# Altium PCB InterfaceBoard_MPCB.PcbDoc (part 3 of 3)
Units mil, origin at the board's own origin, x right, y up, seen from the top; angles counter-clockwise.
Board outline 1629.92 x 1653.54 mil, 4 copper layers (Top Layer, Power, Ground, Bottom Layer), stack 61.899 mil thick; 94 components, 58 nets, 296 pads, 186 vias.
Unrouted connection lines stored in the file: 1.
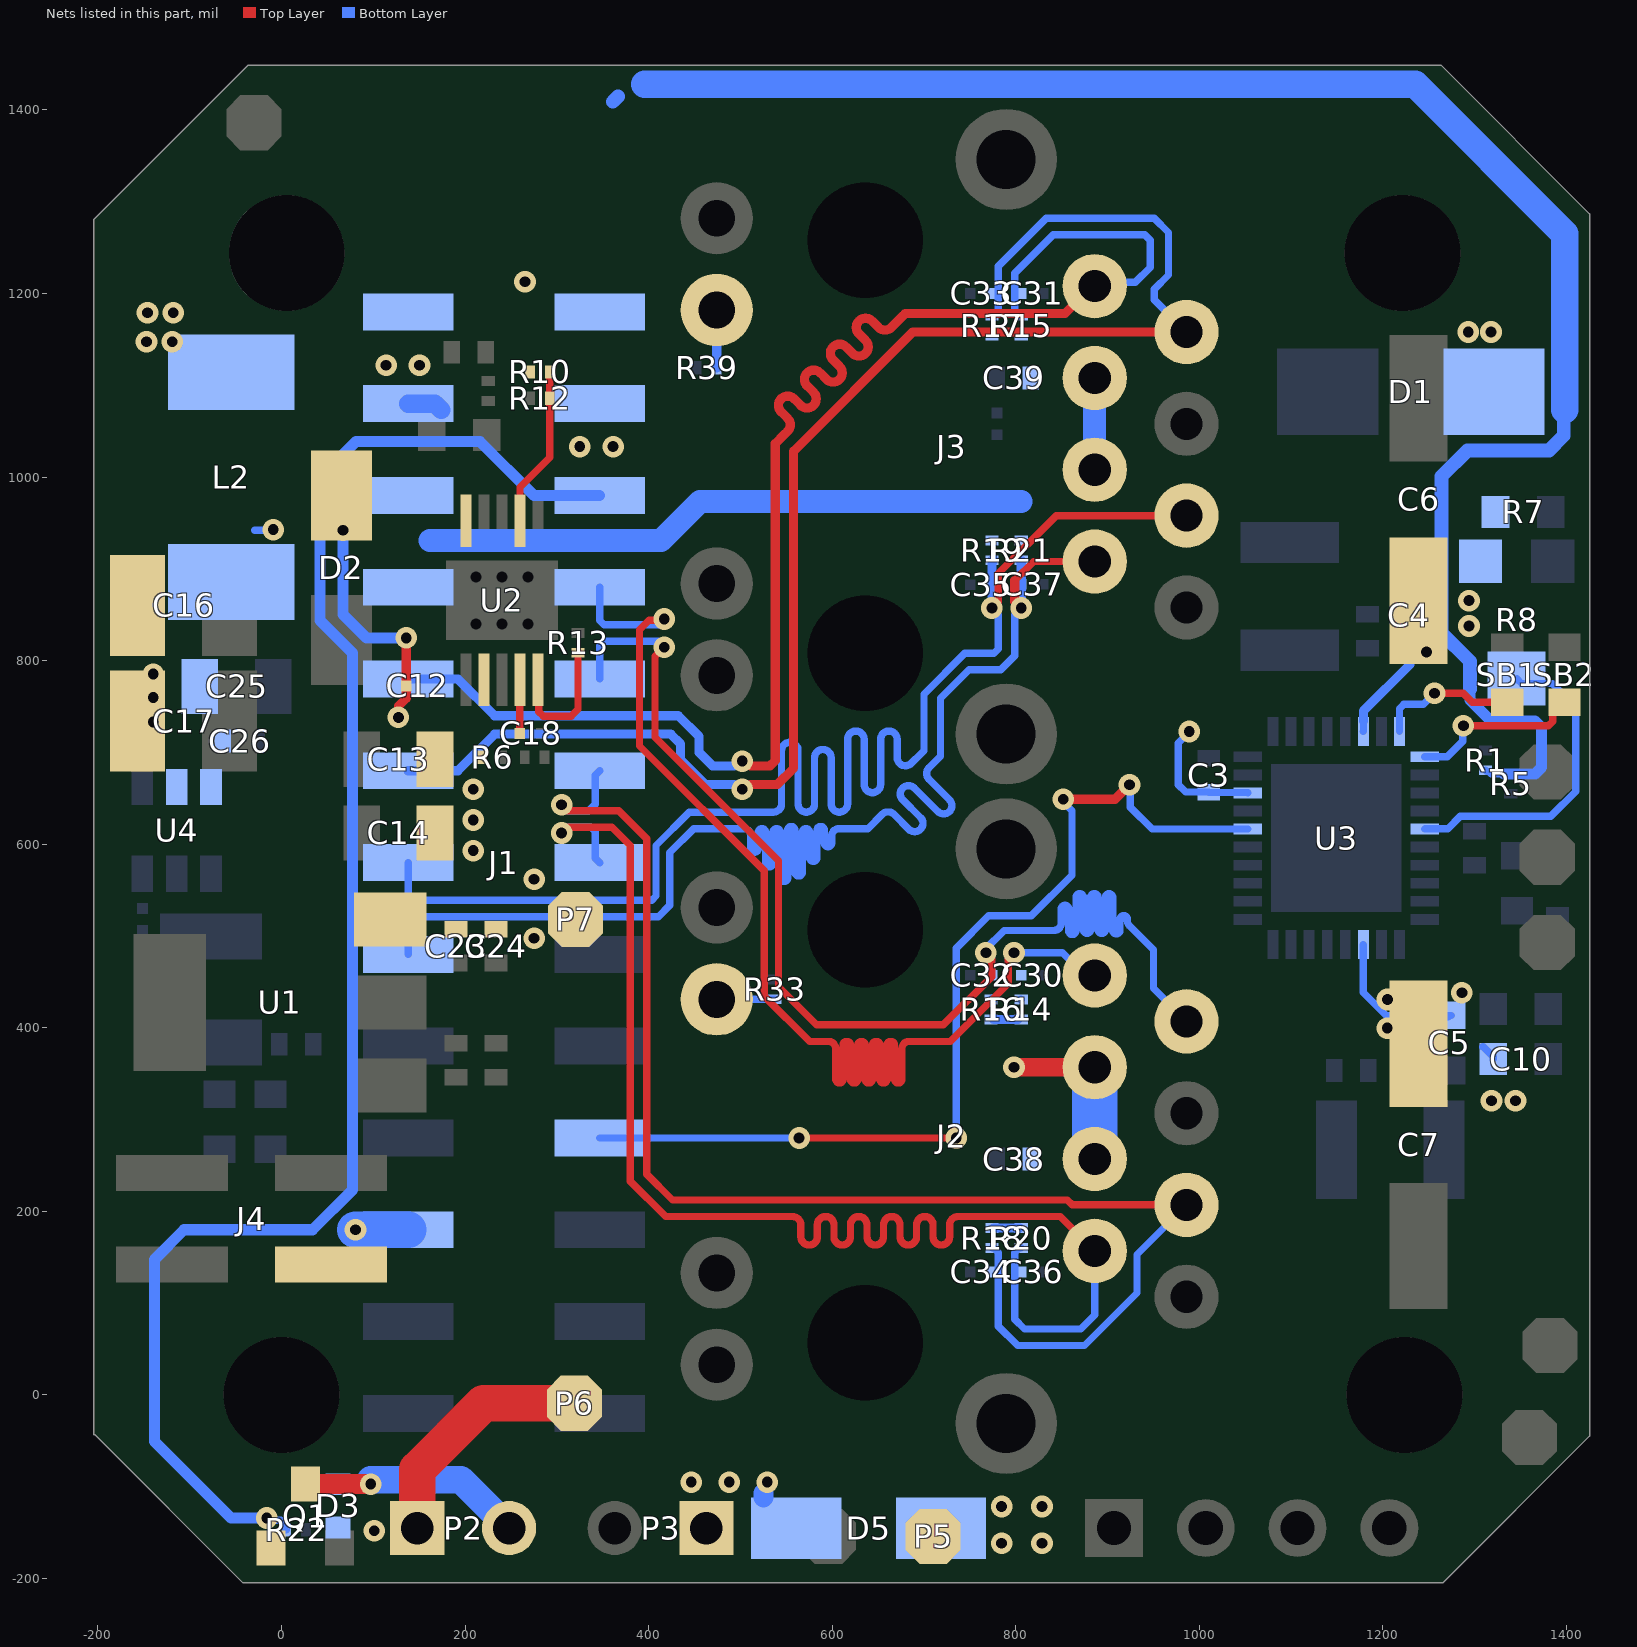
[diagram p4: the nets of this part, all layers, seen from the top]

## Via types
v1: diameter 23.62, hole 11.81, Top Layer to Bottom Layer, 186 vias

## Nets (pads, with @x,y where several pads share a name; then routed paths per layer and width w, separated by ;. In a path a pad name is that pad's centre, name@x,y a point inside that pad or via, vN(x,y) a via of type N, cw(c..) or ccw(c..) an arc to the next point about the centre after c; other vN are vias at no path point) (continued)
NetD5_2: D5.2 P3.1 | length 4.6
  Bottom Layer w22.01: 525,-107 525,-111.32 525.21,-111.54
  other v1: 446.34,-95 487.83,-95 529.31,-95
NetJ2_10: J2.10 R33.2 | length 63.2
  Bottom Layer w8: J2.10@474.18,431 R33.2@537.35,431
NetJ3_10: J3.10 R39.2 | length 63
  Bottom Layer w10: R39.2@474.18,1119 J3.10@474.18,1182.02
NetR7_1: R7.1 R8.1
NetR8_2: R8.2 U3.23 | length 350.6
  Bottom Layer w8: U3.23@1245.59,616.56 1246.08,617.04 1270.8,617.04 1284.1,630.34 1382.86,630.34 1410.01,657.49 1410.01,749.56 1384.45,775.12 1350.98,775.12 R8.2@1345.64,780.46
NetSB1_1: SB1.1 U3.18 | length 153.2
  Top Layer w8: v1(1256.25,764.49) 1287.51,764.49 1297.47,754.53 SB1.1@1335.39,754.53
  Bottom Layer w8: U3.18@1218.03,722.86 1218.03,747.64 1222.72,752.33 1243.76,752.33 1255.92,764.49 v1(1256.25,764.49)
NetSB2_1: SB2.1 U3.19 | length 191.8
  Top Layer w8: v1(1287.65,729.06) 1380.26,729.06 1384.95,733.75 1384.95,743.53 1395.95,754.53 SB2.1@1397.64,754.53
  Bottom Layer w8: U3.19@1245.59,695.3 1270,695.3 1286.87,712.16 1286.87,728.28 v1(1287.65,729.06)
OPTO_IN: J1.5 Q1.1 R22.1 | length 1767.6
  Bottom Layer w8: v1(-16,-134) -13.5,-136.5 -0.83,-136.5 3.86,-141.19 3.86,-145.68 R22.1@5.17,-147
  Bottom Layer w12: v1(-16,-134) -55,-134 -138.19,-50.81 -138.19,147.81 -106,180 33.89,180 77.19,223.31 77.19,808.35 42,843.54 42,1000 81,1039 216,1039 275,980 J1.5@346.65,980
PH: C12.2 D2.1 L2.1 U2.10 | length 282.1
  Top Layer w10: v1(127.36,738.21) 127.36,750.47 135.93,759.04 C12.2@135.93,772.49 v1(135.93,824.83)
  Bottom Layer w8: -29,942 -9,942 v1(-9,942.75)
  Bottom Layer w12: v1(67,942) 67,850.22 92.4,824.83 v1(135.93,824.83)
RCS: D3.1 P2.2 Q1.3 | length 279.6
  Top Layer w22: Q1.3@26,-97.16 v1(97.31,-97.16)
  Bottom Layer w20: D3.1@61.66,-97.16 v1(97.31,-97.16)
  Bottom Layer w22: v1(97.31,-97.16) v1(97.31,-97.16)
  Bottom Layer w30: v1@97.31,-92.16 195.15,-92.16 P2.2@247.99,-145
RT/CLK: R13.2 U2.5 | length 135.1
  Top Layer w8: U2.5@279.61,773.01 280.33,772.29 280.33,744.31 285.02,739.62 315.52,739.62 323.01,747.11 R13.2@323.01,805.49
RXA_N: C36.1 J1.13 J2.7 R20.2 | length 1546.5
  Top Layer w8: v1(305.2,612.31) 311.51,618.62 360,618.62 380,598.62 380,233 418.63,194.37 534.88,194.37 556.88,194.37 cw(c556.88,185.37) 565.88,185.37 565.88,172.29 ccw(c574.88,172.29) 583.88,172.29 583.88,185.37 cw(c592.88,185.37) 601.88,185.37 601.88,172.29 ccw(c610.88,172.29) 619.88,172.29 619.88,185.37 cw(c628.88,185.37) 637.88,185.37 637.88,172.29 ccw(c646.88,172.29) 655.88,172.29 655.88,185.37 cw(c664.88,185.37) 673.88,185.37 673.88,172.29 ccw(c682.88,172.29) 691.88,172.29 691.88,185.37 cw(c700.88,185.37) 709.88,185.37 709.88,172.29 ccw(c718.88,172.29) 727.88,172.29 727.88,185.37 cw(c736.88,185.37) 736.88,194.37 771.89,194.37 848.6,194.37 J2.7@885.99,156.98
  Bottom Layer w8: v1(305.2,612.31) 311.51,618.62 334.9,618.62 ; 337.28,618.62 341.97,613.94 341.97,584.69 J1.13@346.65,580 ; R20.2@806,160.17 804.03,160.17 799.01,155.15 799.01,82.4 809.46,71.94 870.81,71.94 885.99,87.13 J2.7@885.99,156.98
RXA_P: C34.1 J1.11 J2.6 R18.2 | length 1547
  Top Layer w8: v1(305.2,642.93) 308.36,639.78 311.51,636.62 367.46,636.62 398,606.08 398,240.46 426.08,212.37 550.36,212.37 605.27,212.37 856.06,212.37 861.33,207.1 985.88,207.1 J2.6@985.99,206.98
  Bottom Layer w8: v1(305.2,642.93) 311.51,636.62 334.9,636.62 341.97,643.69 341.97,675.31 J1.11@346.65,680 ; R18.2@774.02,160.18 775.98,160.18 781.01,155.15 781.01,74.95 802.01,53.94 874.94,53.94 932,111.01 932,152.99 J2.6@985.99,206.98
RXB_N: C37.1 J1.16 J3.7 R21.2 | length 1710.4
  Top Layer w8: v1@798.93,864.33 v1(805.92,857.34) ; 798.93,887.47 819.47,908.01 J3.7@885.99,908.01
  Top Layer w10: v1@798.93,864.33 798.93,887.47
  Bottom Layer w8: J1.16@137.99,480 137.99,516.31 142.68,521 410.77,521 423.18,533.41 423.18,590.98 449.21,617 459.43,617 503.43,617 cw(c503.43,609) 511.43,609 511.43,595.37 ccw(c515.43,595.37) 519.43,595.37 519.43,613 cw(c523.43,613) 527.43,613 527.43,579.37 ccw(c531.43,579.37) 535.43,579.37 535.43,613 cw(c539.43,613) 543.43,613 543.43,563.37 ccw(c547.43,563.37) 551.43,563.37 551.43,615.2 cw(c555.43,615.2) 559.43,615.2 559.43,569.41 ccw(c563.43,569.41) 567.43,569.41 567.43,613 cw(c571.43,613) 575.43,613 575.43,585.41 ccw(c579.43,585.41) 583.43,585.41 583.43,615.35 cw(c587.43,615.35) 591.43,615.35 591.43,601.41 ccw(c595.43,601.41) 599.43,601.41 599.43,609 cw(c607.43,609) 607.43,617 639,617 654.56,632.56 cw(c660.92,626.19) 667.28,632.56 683.5,616.34 ccw(c689.87,622.7) 696.23,616.34 ccw(c689.87,622.7) 696.23,629.07 676.76,648.54 cw(c683.12,654.9) 676.76,661.27 cw(c683.12,654.9) 689.48,661.27 715.12,635.64 ccw(c721.48,642) 727.84,635.64 ccw(c721.48,642) 727.84,648.37 705.47,670.74 cw(c711.83,677.1) 705.47,683.47 718,696 718,713.6 718,758.99 749.02,790.01 783.7,790.01 798.93,805.24 798.93,850.34 v1(805.92,857.34)
  Bottom Layer w10: R21.2@803.94,909.29 R21.2@804,909.35 ; v1@805.94,857.35 805.94,883.29 R21.2@805.94,909.29
RXB_P: C35.1 J1.14 J3.6 R19.2 | length 1699.9
  Top Layer w8: v1(773.93,857.34) 780.93,864.34 780.93,894.92 844.01,958.01 J3.6@985.99,958.01
  Bottom Layer w8: J1.14@137.99,580 137.99,543.69 142.68,539 403.31,539 408,543.69 408,598.69 444.31,635 494.17,635 535.79,635 ccw(c535.79,644) 544.79,644 544.79,702.04 cw(c553.79,702.04) 562.79,702.04 562.79,644 ccw(c571.79,644) 580.79,644 580.79,694.23 cw(c589.79,694.23) 598.79,694.23 598.79,644 ccw(c607.79,644) 616.79,644 616.79,714.25 cw(c625.79,714.25) 634.79,714.25 634.79,665.24 ccw(c643.79,665.24) 652.79,665.24 652.79,714.25 cw(c661.79,714.25) 670.79,714.25 670.79,694.51 ccw(c679.79,694.51) 686.15,688.15 697.29,699.29 700,702 700,763.47 744.54,808.01 776.24,808.01 780.93,812.69 780.93,850.35 v1(773.93,857.34)
  Bottom Layer w10: v1@773.95,857.36 C35.1@773.95,883.3 ; C35.1@774.02,882.78 R19.2@774.02,909.35
SS/TR: C18.2 U2.4 | length 57.4
  Top Layer w8: C18.2@259.5,720.76 259.72,720.98 259.72,777.8 U2.4@259.93,778.01
STEP: J1.19 U3.6 | length 1083
  Top Layer w8: v1(564,280) v1(735.12,280)
  Top Layer w10: v1(851.65,649) 908.03,649 v1(923.89,664.86)
  Bottom Layer w8: J1.19@346.65,280 v1(564,280) ; v1(735.12,280) 735.09,486.85 770.24,522 816.95,522 861.22,566.26 861.22,636.5 851.65,646.06 v1(851.65,649) ; v1@924.89,665.86 924.89,640.28 948.61,616.56 U3.6@1052.68,616.56
TXA_N: C32.1 J1.9 J2.2 R16.2 | length 1478.7
  Top Layer w8: v1(417,814.69) 407,804.69 407,716.41 541.43,581.98 541.43,444.57 582.84,403.16 721.05,403.16 773.7,455.81 773.7,475.45 v1(767.39,481.76)
  Bottom Layer w8: J1.9@346.65,780 346.65,816.31 351.34,821 410.69,821 v1(417,814.69) ; 773.7,463.19 773.7,471.22 767.39,477.53 v1(767.39,481.76) 767.39,485.99 787.49,506.09 805.6,506.09 841.6,506.09 ccw(c841.6,514.09) 849.6,514.09 849.6,529.44 cw(c853.6,529.44) 857.6,529.44 857.6,505.7 ccw(c861.6,505.7) 865.6,505.7 865.6,542.05 cw(c869.6,542.05) 873.6,542.05 873.6,507.02 ccw(c877.6,507.02) 881.6,507.02 881.6,542.05 cw(c885.6,542.05) 889.6,542.05 889.6,507.02 ccw(c893.6,507.02) 897.6,507.02 897.6,542.05 cw(c901.6,542.05) 905.6,542.05 905.6,506.48 ccw(c909.6,506.48) 913.6,506.48 913.6,518.19 cw(c917.6,518.19) 921.6,518.19 921.6,516.67 ccw(c929.6,516.67) 923.95,511.01 948.61,486.35 949.99,484.97 949.99,442.99 J2.2@985.99,406.98 ; R16.2@774.02,430.83 R16.2@775.33,430.83 ; R16.2@774.02,432.14 R16.2@775.33,430.83 ; R16.2@775.98,430.83 R16.2@775.33,430.83
TXA_P: C30.1 J1.7 J2.1 R14.2 | length 1483.9
  Top Layer w8: v1(417,845.31) 415.89,844.2 400.43,844.2 390,833.77 390,707 526,571 526,434.54 575.38,385.16 595.88,385.16 cw(c595.88,377.16) 603.88,377.16 603.88,343.9 ccw(c607.88,343.9) 611.88,343.9 611.88,381.16 cw(c615.88,381.16) 619.88,381.16 619.88,343.9 ccw(c623.88,343.9) 627.88,343.9 627.88,381.16 cw(c631.88,381.16) 635.88,381.16 635.88,343.9 ccw(c639.88,343.9) 643.88,343.9 643.88,381.16 cw(c647.88,381.16) 651.88,381.16 651.88,343.9 ccw(c655.88,343.9) 659.88,343.9 659.88,381.16 cw(c663.88,381.16) 667.88,381.16 667.88,343.9 ccw(c671.88,343.9) 675.88,343.9 675.88,377.16 cw(c683.88,377.16) 683.88,385.16 687.88,385.16 728.5,385.16 791.7,448.36 791.7,475.45 v1(798.01,481.76)
  Bottom Layer w8: J1.7@346.65,880 346.65,843.69 351.34,839 410.69,839 v1(417,845.31) ; 791.7,463.19 791.7,471.22 798.01,477.53 v1(798.01,481.76) 850.87,481.76 875.65,456.98 J2.1@885.99,456.98 ; R14.2@804.03,430.83 R14.2@806,430.83 R14.2@805.46,431.37
TXB_N: C33.1 J1.12 J3.2 R17.2 | length 1709.2
  Top Layer w10: v1(502.02,659.92) 505.71,659.92 511.02,665.23 540.43,665.23 558,682.81 558,1028.22 687.82,1158.05 J3.2@985.99,1158.01 J3.2@985.99,1158.01
  Bottom Layer w8: R17.2@774.02,1175.83 775.98,1175.83 781.01,1180.85 781.01,1229.7 833.31,1282 899,1282 950.83,1282 966.41,1266.43 966.41,1220.12 950.88,1204.6 950.88,1193.12 J3.2@985.99,1158.01
  Bottom Layer w10: J1.12@137.99,680 192.21,680 232.21,720 424,720 434.81,709.19 434.81,691.79 461.37,665.23 493.02,665.23 498.33,659.92 v1(502.02,659.92)
TXB_P: C31.1 J1.10 J3.1 R15.2 | length 1708.2
  Top Layer w10: v1(502.02,690.54) 505.71,690.54 511.02,685.23 532.14,685.23 538,691.09 538,1036.51 547.88,1046.39 551.42,1049.93 ccw(c544.35,1057) 551.42,1064.07 544.35,1071.14 cw(c551.42,1078.21) 544.35,1085.28 cw(c551.42,1078.21) 558.49,1085.28 565.56,1078.21 ccw(c572.63,1085.28) 579.7,1078.21 ccw(c572.63,1085.28) 579.7,1092.35 572.63,1099.42 cw(c579.7,1106.49) 572.63,1113.57 cw(c579.7,1106.49) 586.77,1113.57 593.85,1106.49 ccw(c600.92,1113.57) 607.99,1106.49 ccw(c600.92,1113.57) 607.99,1120.64 600.92,1127.71 cw(c607.99,1134.78) 600.92,1141.85 cw(c607.99,1134.78) 615.06,1141.85 622.13,1134.78 ccw(c629.2,1141.85) 636.27,1134.78 ccw(c629.2,1141.85) 636.27,1148.92 629.2,1155.99 cw(c636.27,1163.06) 629.2,1170.13 cw(c636.27,1163.06) 643.34,1170.13 650.41,1163.06 ccw(c657.48,1170.13) 664.56,1163.06 677.08,1175.59 679.54,1178.05 853.47,1178.05 883.43,1208.01 J3.1@885.99,1208.01
  Bottom Layer w8: R15.2@806,1175.83 804.03,1175.83 799.01,1180.85 799.01,1222.25 840.76,1264 899,1264 940.55,1264 946.41,1258.14 946.41,1228.41 930.17,1212.17 J3.1@890.16,1212.17
  Bottom Layer w10: J1.10@137.99,780 192.21,780 232.21,740 432.28,740 454.81,717.47 454.81,700.08 469.66,685.23 493.02,685.23 498.33,690.54 v1(502.02,690.54) ; J3.1@885.99,1208.01 J3.1@890.16,1212.17
VCC_3V3: C3.2 C23.2 C24.2 J1.1 J1.3 P7.1 R1.1 R5.1 U1.3 U3.8 | length 2049.1
  Top Layer w8: v1@269,496 269.94,496 v1@270.32,495.63
  Bottom Layer w8: v1(988.96,722.86) 988.96,722.32 977,710.36 977,664.92 985.06,656.86 C3.2@1010.24,656.86 ; C3.2@1009.77,656.86 1010.24,656.39 1052.21,656.39 U3.8@1052.68,655.93 ; R1.1@1311.75,680.58 1313.06,679.27 1315.03,679.27 1317.72,676.58 1331.86,676.58
  Bottom Layer w12: 1294.75,768.94 1294.75,757.06 1317.72,734.09 1365.72,734.09 1372.75,727.06 1372.75,683.61 1365.72,676.58 1331.86,676.58
  Bottom Layer w15: 361,1409 366.5,1414.5 ; 1294.75,768.94 1294.75,799.34 1263.88,830.2 1263.88,1000.88 1292,1029 1380.88,1029 1397,1045.12 1397,1073.54
  Bottom Layer w30: 395.87,1428 1201.95,1428 1235,1428 1398.12,1264.88 1398.12,1073.54
  other v1: 275.22,497.63 275.22,561.84 325,1033.2 361.34,1033.2
VDD_5V: J1.22 J4.1 | length 57.6
  Bottom Layer w40: v1(80.55,180) J1.22@137.99,180 J1.22@137.91,180.08
VDDTXRX1: C38.1 J1.2 J1.4 J2.3 J2.5 R14.1 R16.1 R18.1 R20.1 | length 336.8
  Top Layer w20: v1(798.01,356.98) J2.3@885.99,356.98
  Bottom Layer w10: R18.1@776.02,181.83 R20.1@804,181.83 ; R16.1@776.02,409.18 788.74,409.18 R14.1@802.47,409.18
  Bottom Layer w20: J1.4@137.99,1080 167.13,1080 J1.4@174.07,1073.06
  Bottom Layer w25: J2.5@874.5,288.65 cw(c850.86,280.52) J2.5@874.99,274 ; J2.5@874.99,274 J2.5@885.99,256.98 J2.5@874.99,274
  Bottom Layer w50: J2.5@885.99,256.98 J2.3@885.99,356.98
  other v1: 114,1121.77 150.34,1121.77
VDDTXRX2: C39.1 J1.6 J1.8 J3.3 J3.5 R15.1 R17.1 R19.1 R21.1 | length 761.5
  Bottom Layer w25: 162,931 413.58,931 456.08,973.51 805.94,973.51 ; J3.5@885.99,1008.01 J3.3@885.99,1108.01
VIN: C4.1 C5.1 C6.1 C7.1 C10.2 C13.2 C14.2 D1.2 D5.1 P5.1 R6.2 U2.2 U3.16 U3.31 | length 293.9
  Bottom Layer w8: U3.31@1178.66,490.58 1178.66,452.07 1178.66,438.4 1203.58,413.48 1269.75,413.48 C5.1@1271,412.23 ; U3.16@1178.66,722.86 1178.89,723.09 U3.16@1178.89,734.17 ; C5.1@1272.25,413.48 C5.1@1274.75,413.48 ; C10.2@1308.75,379.48 1309.24,379.48 1320.24,368.48 C10.2@1320.24,365.98
  Bottom Layer w10: U3.16@1178.89,734.17 1178.89,745.26 1229.34,795.71 C4.1@1229.34,819.36
  other v1: 784.54,-161.5 828.51,-161.5 784.54,-121.51 828.51,-121.51 1318.24,320.54 1344.32,320.54 1204.76,399.69 1205.03,430.77 1286.02,438.24 209,593 209,626.46 209,659.92 1247.34,809.36 1293.84,837.85 1293.84,865.36 1293,1158 1317.82,1158
VOUT_12V: C16.2 C17.2 C25.2 C26.2 D3.2 L2.2 P2.1 P6.1 R10.2 U4.2 U4.3 | length 264.8
  Top Layer w40: P2.1@147.99,-145 147.99,-80.99 219.99,-9 P6.1@319,-9
  other v1: 100.99,-148 -139.78,733.1 -139.78,759.72 -139.78,785.34 -147,1147.44 -119,1147.44 -146,1179 -118,1179 265.37,1212.86
VSENSE: R10.1 R12.2 U2.7 | length 176.7
  Top Layer w8: U2.7@259.93,951.24 259.93,988.89 292.34,1021.31 R12.2@292.34,1085.72 R10.1@292.35,1114.49
pads on no net: J2.11 J2.12 J2.MH1 J2.MH2 J3.11 J3.12 J3.MH1 J3.MH2 U2.6 U3.9 U3.11 U3.17

## Polygon pours and split planes (outlines as drawn)
GND on Ground (split plane): 1405.09,1278.41 1405.09,-36.48 1256.94,-184.63 -33.49,-184.63 -184.63,-33.48 -184.63,1271.95 -27.86,1428.72 704.93,1428.72 704.93,1268 705.22,1265.06 706.07,1262.23 707.47,1259.63 709.34,1257.34 711.63,1255.47 714.23,1254.07 717.06,1253.22 720,1252.93 905.96,1252.93 905.96,815.07 716,815.07 713.06,814.78 710.23,813.93 707.63,812.53 705.34,810.66 703.47,808.37 702.07,805.77 701.22,802.94 700.93,800 700.93,515 701.22,512.06 702.07,509.23 703.47,506.63 705.34,504.34 707.63,502.47 710.23,501.07 713.06,500.22 716,499.93 905.96,499.93 905.96,55.07 711,55.07 708.06,54.78 705.23,53.93 702.63,52.53 700.34,50.66 698.47,48.37 697.07,45.77 696.22,42.94 695.93,40 695.93,-80 696.22,-82.94 697.07,-85.77 698.47,-88.37 700.34,-90.66 702.63,-92.53 705.23,-93.93 708.06,-94.78 711,-95.07 1039,-95.07 1041.94,-94.78 1044.77,-93.93 1047.37,-92.53 1049.66,-90.66 1051.53,-88.37 1052.93,-85.77 1053.78,-82.94 1054.07,-80 1054.07,1428.72 1254.78,1428.72
GND_ETH on Ground (split plane): 1023.93,-64.93 726.07,-64.93 726.07,24.93 921.03,24.93 923.97,25.22 926.8,26.07 929.41,27.47 931.69,29.34 933.56,31.63 934.96,34.23 935.82,37.06 936.11,40 936.11,515 935.82,517.94 934.96,520.77 933.56,523.37 931.69,525.66 929.41,527.53 926.8,528.93 923.97,529.78 921.03,530.07 731.07,530.07 731.07,784.93 921.03,784.93 923.97,785.22 926.8,786.07 929.41,787.47 931.69,789.34 933.56,791.63 934.96,794.23 935.82,797.06 936.11,800 936.11,1268 935.82,1270.94 934.96,1273.77 933.56,1276.37 931.69,1278.66 929.41,1280.53 926.8,1281.93 923.97,1282.78 921.03,1283.07 735.07,1283.07 735.07,1428.72 1023.93,1428.72
VCC_3V3 on Power (split plane): 379.93,199.93 380.22,196.99 381.07,194.16 382.47,191.56 384.34,189.27 386.63,187.4 389.23,186 390.6,185.59 391.05,185.29 393,184.9 393.51,185 395,184.86 397.94,185.15 398.97,185.46 399.99,185.15 402.93,184.86 921.03,184.86 923.97,185.15 926.8,186 929.41,187.4 931.69,189.27 933.56,191.56 934.96,194.16 935.82,196.99 936.11,199.93 936.11,421.94 935.82,424.88 935.77,425.03 935.82,425.17 936.11,428.12 936.11,805.93 1020.93,805.93 1020.93,523 1020.93,114.81 258.07,114.81 258.07,1048.24 379.93,1048.24
VDDTXRX1 on Power (split plane): 473.93,883.99 473.93,783.99 473.93,421.94 474.22,419 475.07,416.18 476.47,413.57 478.34,411.29 480.63,409.41 483.23,408.02 486.06,407.16 489,406.87 905.96,406.87 905.96,215 410.07,215 410.07,1063.31 409.78,1066.25 408.93,1069.08 407.53,1071.68 405.66,1073.97 403.37,1075.84 400.77,1077.24 397.94,1078.09 395,1078.38 88.07,1078.38 88.07,1147.93 473.93,1147.93
MOTOR_B2 on Power (split plane): 1185.27,744.13 1098,744.13 1095.06,743.84 1092.23,742.99 1089.63,741.59 1087.34,739.72 1085.47,737.44 1084.07,734.83 1083.22,732 1082.93,729.06 1082.93,81.23 1067.34,65.65 1065.47,63.36 1064.07,60.76 1063.22,57.93 1062.93,54.99 1063.22,52.05 1064.07,49.22 1065.47,46.62 1067.34,44.33 1069.63,42.46 1072.23,41.06 1075.06,40.21 1078,39.92 1080.94,40.21 1082.93,40.81 1082.93,-47.92 735.16,-47.92 735.16,84.67 1036,84.67 1038.94,84.96 1041.77,85.82 1044.37,87.21 1046.66,89.08 1048.53,91.37 1049.93,93.97 1050.78,96.8 1051.07,99.74 1051.07,523 1051.07,805.93 1185.27,805.93
VIN on Power (split plane): 1327.93,1231.76 1327.93,829 1327.93,776.33 1327.93,664.9 1327.93,610.07 1251.84,610.07 1248.9,609.78 1246.07,608.93 1243.47,607.53 1241.18,605.66 1239.31,603.37 1237.92,600.77 1237.06,597.94 1236.77,595 1236.77,459 1237.06,456.06 1237.92,453.23 1239.31,450.63 1241.18,448.34 1243.47,446.47 1246.07,445.07 1248.9,444.22 1251.84,443.93 1405.09,443.93 1405.09,31.08 1405,31.09 1403.05,30.71 1401.4,29.6 1400.29,27.95 1399.91,26 1400.29,24.05 1401.4,22.39 1405.09,18.7 1405.09,-36.48 1256.94,-184.63 1149.32,-184.63 1148.95,-184.38 1147,-183.99 1145.05,-184.38 1144.68,-184.63 425.11,-184.63 425.11,40 424.82,42.94 423.96,45.77 422.57,48.37 420.7,50.66 418.41,52.53 415.81,53.93 412.98,54.78 410.04,55.07 -52.93,55.07 -52.93,1048.24 227.93,1048.24 227.93,99.74 228.22,96.8 229.07,93.97 230.47,91.37 232.34,89.08 234.63,87.21 237.23,85.82 240.06,84.96 243,84.67 705.01,84.67 705.01,-62.99 705.3,-65.93 706.16,-68.76 707.56,-71.37 709.43,-73.65 711.71,-75.52 714.32,-76.92 717.15,-77.78 720.09,-78.06 1098,-78.06 1100.94,-77.78 1103.77,-76.92 1106.37,-75.52 1108.66,-73.65 1110.53,-71.37 1111.93,-68.76 1112.78,-65.93 1113.07,-62.99 1113.07,79.74 1113.07,713.99 1200.35,713.99 1203.29,714.28 1206.11,715.14 1208.72,716.53 1211,718.4 1212.88,720.69 1214.27,723.29 1215.13,726.12 1215.42,729.06 1215.42,821 1215.13,823.94 1214.27,826.77 1212.88,829.37 1211,831.66 1208.72,833.53 1206.11,834.93 1203.29,835.78 1200.35,836.07 921.03,836.07 918.09,835.78 915.26,834.93 912.66,833.53 910.37,831.66 908.5,829.37 907.11,826.77 906.25,823.94 905.96,821 905.96,437.02 504.07,437.02 504.07,783.99 504.07,883.99 504.07,1163 503.78,1165.94 502.93,1168.77 501.53,1171.37 499.66,1173.66 497.37,1175.53 494.77,1176.93 491.94,1177.78 489,1178.07 340.07,1178.07 340.07,1268 340.07,1350.93 1208.76,1350.93
5V_EXT on Power (split plane): 1405.09,1278.41 1405.09,474.07 1266.91,474.07 1266.91,579.93 1343,579.93 1345.94,580.22 1348.77,581.07 1351.37,582.47 1353.66,584.34 1355.53,586.63 1356.93,589.23 1357.78,592.06 1358.07,595 1358.07,664.9 1358.07,776.33 1358.07,829 1358.07,1238 1357.78,1240.94 1356.93,1243.77 1355.53,1246.37 1353.66,1248.66 1225.66,1376.66 1223.37,1378.53 1220.77,1379.93 1217.94,1380.78 1215,1381.07 325,1381.07 322.06,1380.78 319.23,1379.93 316.63,1378.53 314.34,1376.66 312.47,1374.37 311.07,1371.77 310.22,1368.94 309.93,1366 309.93,1283.07 -173.51,1283.07 -27.86,1428.72 1254.78,1428.72
VOUT_12V on Power (split plane): 309.93,1178.07 73,1178.07 70.06,1177.78 67.23,1176.93 64.63,1175.53 62.34,1173.66 60.47,1171.37 59.07,1168.77 58.22,1165.94 57.93,1163 58.22,1160.06 58.24,1160 58.22,1159.94 57.93,1157 57.93,1078.38 -68,1078.38 -70.94,1078.09 -73.77,1077.24 -76.37,1075.84 -78.66,1073.97 -80.53,1071.68 -81.93,1069.08 -82.78,1066.25 -83.07,1063.31 -83.07,40 -82.78,37.06 -81.93,34.23 -80.53,31.63 -78.66,29.34 -76.37,27.47 -73.77,26.07 -70.94,25.22 -68,24.93 394.96,24.93 394.96,-184.63 -33.49,-184.63 -184.63,-33.48 -184.63,1252.93 309.93,1252.93

## Other copper
Top Layer:
  rectangle net PH: -93,922.69 114,1039
  rectangle net GND: 1040,1142.48 1155.81,1182.14
  rectangle net VIN: 1222.74,796.46 1307.47,858.01
  rectangle net VIN: 1195.02,807.22 1307.64,934.26
  rectangle net #UART_RX: -185.26,110.5 -32.62,172
  rectangle net VIN: 675.92,-191 843,-95
  rectangle net VIN: 1280.2,1129 1362,1168.66
  rectangle net NetSB2_1: 1364,739.53 1415.14,769.53
  rectangle net MOTOR_A1: 875.5,-176.5 938.49,-88.01
  rectangle net NetD5_2: 424,-193 548,-79
  rectangle net GND: 1040,1014 1271,1159.73
  region net VOUT_12V: 280.02,1227 250.02,1227 250.02,1103.22 280.02,1103.22
  rectangle net VCC_3V3: 265,479.6 360,576.9
  region net GND: 197.63,1152 171.63,1152 171.63,1045.71 197.63,1045.71
  rectangle net GND: -161.07,374.08 253,479.61
  rectangle net VOUT_12V: -195.75,582.31 -107.75,1199.55
  rectangle net GND: 1174.88,91 1305.24,245
  rectangle net VIN: 1193.34,303 1356.5,451.67
  rectangle net GND: 1317.89,799.53 1417,895
  rectangle net GND: 94.82,846.3 193.61,915.1
  rectangle net VCC_3V3: 79.08,488.13 360,548.13
  rectangle net 5V_EXT: -25,306.6 253,366.6
  rectangle net GND: -185.26,192 -44.54,504.7
  rectangle net GND: 14,-185.98 79.19,-137
  rectangle net OPTO_IN: -33,-185.98 4.39,-122.75
  rectangle net VDD_5V: -12.03,110.5 115.02,201.65
  rectangle net GND: -93,582.31 107.36,915.1
  region net NetC19_2: 239.88,1152 207.97,1152 207.97,1098.72 239.88,1098.72
  rectangle net GND: 254.02,1045.71 279.52,1095.72
  rectangle net GND: 162.34,994.32 226.69,1016
  region net GND: 226.69,1016 214.65,1016 214.65,903.99 226.69,903.99
  region net GND: 197.63,1063.21 148.61,1063.21 148.61,994.32 197.63,994.32
  rectangle net COMP: 207.97,1028.21 239.88,1091.72
  region net COMP: 246.38,1091.72 234.34,1091.72 234.34,922.69 246.38,922.69
  rectangle net PH: 15,922.69 206.78,980.78
  rectangle net EN/TPS: 235.08,687.29 270.32,701.86
  region net GND: 277.46,726.67 277.46,687.29 292.03,687.29 292.03,726.67
  rectangle net VIN: 214.43,691.29 226.46,806.55
  rectangle net VIN: 146.36,576.9 226.46,732.21
  rectangle net BOOT: 153.65,749.46 206.78,808.69
  rectangle net GND: 176.63,821.31 332.57,915.1
Bottom Layer:
  rectangle net PH: -123.77,844.57 14.02,958
  rectangle net VOUT_12V: -160,1138.37 -81,1194
  rectangle net VOUT_12V: -160,1072.91 14.02,1157
  rectangle net 5VOUT: 1295.25,563.82 1342,595
  rectangle net GND: 1039,1142.48 1155.81,1182.14
  rectangle net RCS: 41.79,-108.97 113,-75
  rectangle net VIN: 1210.84,786.92 1259.34,813.86
  rectangle net GND: 1346,834.53 1411.63,932.04
  rectangle net GND: -194.75,200.08 -25,297.08
  rectangle net NetC20_2: -132.1,500.08 14.71,526.07
  rectangle net VIN: 658,-194 843,-95
  rectangle net GND: 1249.22,91 1310.24,248.28
  rectangle net VIN: 1298.24,309 1356.38,394.48
  rectangle net VIN: 1174.66,375.48 1335.24,394.48
  rectangle net VIN: 1174.66,379.48 1293.21,442.4
  rectangle net NetC10_1: 1212.13,470.83 1253.38,502.32
  rectangle net 5V_EXT: 5.47,306.58 63.5,359.92
  rectangle net GND: 25.62,369.58 63.5,799
  rectangle net 5V_EXT: -194.75,306.58 15.12,444.49
  region net TXA_P: 813.28,463.44 787.7,463.44 787.7,425.51 813.28,425.51
  rectangle net GND: 1174.88,340.98 1289.75,368.48
  rectangle net GND: 1189.32,91 1289.75,368.48
  rectangle net 5V_EXT: 1328.38,506.32 1417.75,552.82
  region net 5V_EXT: -171.38,669.51 -194.75,669.51 -194.75,306.58 -171.38,306.58
  rectangle net GND: -194.75,225 58.97,297.08
  rectangle net 5VOUT: 1295.25,567.82 1372.75,586.19
  rectangle net 5VOUT: 1328.12,563.82 1394.04,608.82
  region net TXA_N: 780.3,463.19 765.73,463.19 765.73,425.51 780.3,425.51
  rectangle net TXB_N: 768.11,1170.51 781.3,1205.95
  rectangle net TXB_P: 800.1,1170.51 813.28,1205.95
  rectangle net RXA_P: 767.72,128.1 780.91,165.49
  rectangle net RXA_N: 798.72,128.1 811.91,165.49
  rectangle net VIN: 1265.88,1045.76 1376.12,1171
  rectangle net VDDTXRX1: 764.2,344.02 813.28,416.49
  rectangle net GND: -46.87,785.1 13.38,835
  rectangle net GND: 1039,841.36 1246,1167
  rectangle net GND: 1167,841.36 1246.84,963.04
  rectangle net NetR7_1: 1279.22,884.79 1337.64,979.5
  rectangle net GND: 1038.03,474.83 1105.83,524.04
  rectangle net GND: 764.2,1063.91 788.5,1120.51
  rectangle net VDDTXRX2: 764.2,925.69 842.14,981.38
  rectangle net VDDTXRX2: 764.2,1129.48 932,1161.8
  rectangle net VDDTXRX2: 798.72,958.01 932,1150.55
  rectangle net VDDTXRX1: 807.5,207 932,306.98
  rectangle net VDDTXRX1: 88.78,1063.21 187.21,1200.08
  rectangle net VCC_3V3: 297.44,1016 395.87,1443.82
  rectangle net VDDTXRX2: 88.78,859.92 187.21,1000.08
  rectangle net VDDTXRX1: 764.2,176.51 842.14,232.21
  rectangle net 5V_EXT: -194.75,669.51 -167.4,1216
  rectangle net VOUT_12V: -157.63,692 -54.75,805.1
  rectangle net NetD5_2: 423,-195 610.21,-78
  rectangle net OPTO_IN: -33,-154.28 10.49,-120.78
  rectangle net VOUT_12V: 47.88,-174.53 177.52,-124.17
  rectangle net GND: 88.78,-59 187.21,100.08
  rectangle net GND: -46.87,537.88 59.5,799
  region net 5V_EXT: -139.78,682.01 -195,682.01 -195,600 -139.78,600
  rectangle net NetC20_2: -162.82,457.75 14.71,512.22
  rectangle net NetC20_1: -163.4,519.91 -139.78,587.52
  region net VOUT_12V: -126,799 -126,642.64 -54.75,642.64 -54.75,799
  rectangle net GND: -88.6,537.88 29.5,635.04
  rectangle net NetC20_2: -128.1,474.14 -17.47,526.07
  rectangle net NetC20_2: -132.58,474.14 -99.01,587.52
Power (plane layer: these items are gaps in the copper):
  lines w10: 393,190 402.93,199.93 ; 1070.77,-204.72 1073,-202.5 ; 1147,-189.09 1162.63,-204.72 ; 1338.19,664.9 1343,669.71 ; 1343,776.33 1343,829 ; 1405,26 1413,18 ; 410.04,-204.72 410.04,-204.72
  lines w30: 73,1157 73,1063.31 ; 73,1163 325,1163 ; 325,1263.4 325,1366 1215,1366 1343,1238 1343,829 1343,776.33 1343,664.9 1343,595 1251.84,595 1251.84,459 1425.19,459 ; 395,199.93 395,1063.31 243,1063.31 ; 402.93,199.93 548.07,199.93 ; 540,199.93 582,199.93 921.03,199.93 921.03,421.94 489,421.94 489,783.99 489,883.99 489,1163 325,1163 ; 720.09,99.74 720.09,-62.99 1098,-62.99 1098,79.74 ; 914.86,421.94 921.03,428.12 921.03,821 1036,821 ; 1078,54.99 1098,74.99 1098,729.06 1200.35,729.06 1200.35,821 1036,821 ; 73,1063.31 -68,1063.31 -68,40 0,40 410.04,40 410.04,-204.72 -41.81,-204.72 -87.35,-159.19 -204.73,-41.8 -204.73,1268 5.62,1268 325,1268 325,1163 ; 73,1063.31 88.54,1063.31 243,1063.31 ; 243,1063.31 243,99.74 1036,99.74 1036,523 1036,821
Ground (plane layer: these items are gaps in the copper):
  lines w30: 711,-80 1039,-80 1039,1448.82 720,1448.82 720,1268 921.03,1268 921.03,800 716,800 716,515 921.03,515 921.03,40 711,40 711,-80

## Silkscreen, mask and mechanical layers (free items; w line width, h text height)
Top Overlay:
  lines w8: 155.75,1161.34 155.75,1113.32 163.99,1105.08 212.6,1105.08 ; 189.3,450.59 189.3,436.7 196,430 249.54,430 ; 258,469 314.54,469 321.24,462.3 321.24,448.41 ; 294.15,723.35 325.59,723.35 332.57,716.38 332.57,710.76 ; 301.27,1085.47 340.76,1085.47 349,1093.71 349,1128
  text "5V_EXT" at 13,1374.83 h50
  text "RJ45_B" at 369.59,1364.01 h50
  text "CFG0" at 1224.18,659.59 h50
  text "RJ45_A" at 367.59,612.98 h50
  text "5VOUT" at 1193,566.59 h50
  text "3V3" at 285.32,560.08 h50
  text "CFG1" at 1229.21,478.59 h50
  text "ARDUINO" at 121.99,162 h40
  text "HEADER" at 121.99,121 h40
  text "CFG3" at 1409.41,93 h50 r90
  text "12V" at 203,-27 h50
  text "MOTOR OUT" at 932.94,-91 h40
  text "PUMP" at 95.99,-96 h40
  text "POWER" at 308.99,-96 h40
  text "CFG2" at 1323.41,-98 h50 r90
  text "GND" at 549,-113.41 h50
  text "VIN" at 674,-113.44 h50
Bottom Overlay:
  circle w10: c-178.91,665.92 r5.08
  lines w8: 1402.41,398.75 1412,389.16 1412,341
  lines w10: -57,-137 -47,-147 -11.4,-147
  text "$ >> 49.9R 0201" at 1271,1385 h65
  text "* >> 10pF 0201" at 1271,1319.06 h65
  text "Note:" at 980,1270 h65
  text "INTERFACING HEADER" at 396.99,1253 h50
  text "*" at 767.2,1191.24 h60
  text "*" at 797.16,1191.24 h60
  text "$" at 756.51,1144 h50 r90
  text "$" at 853.51,1144 h50 r90
  text "$" at 763.01,946.32 h50
  text "$" at 794.98,946.32 h50
  text "*" at 783.85,891.59 h60 r180
  text "*" at 815.7,892.03 h60 r180
  text "*" at 765.19,448.48 h60
  text "*" at 796.16,448.48 h60
  text "$" at 763,364.49 h50
  text "$" at 794.98,364.49 h50
  text "$" at 764.01,197.14 h50
  text "$" at 794.98,197.14 h50
  text "*" at 765.2,142.81 h60 r180
  text "*" at 797.05,142.81 h60 r180
Board Outline:
  lines w10: -203.19,-43.35 -203.19,1281.82 ; -203.19,-43.35 -41.81,-204.72 1265.27,-204.72 1425.19,-44.8 1425.19,1286.73 1263.1,1448.82 -36.19,1448.82 -203.19,1281.82 ; -203.19,-43.35 -203.19,1281.82
Fabrication:
  drawing of 441 lines, arcs and shapes, not listed
  text "Layer" at -260.5,9336.08 h60
  text "Name" at 149.41,9336.08 h60
  text "Material" at 1079.16,9336.08 h60
  text "Thickness" at 1938.93,9336.08 h60
  text "Constant" at 2588.76,9336.08 h60
  text "Board Layer Stack" at 3158.62,9336.08 h60
  text "Top Overlay" at 149.41,9216.08 h60
  text "Top Solder" at 149.41,9096.08 h60
  text "Solder Resist" at 1079.16,9096.08 h60
  text "0.50mil" at 1938.93,9096.08 h60
  text "3.5" at 2588.76,9096.08 h60
  text "1" at -260.5,8976.08 h60
  text "Top Layer" at 149.41,8976.08 h60
  text "1.40mil" at 1938.93,8976.08 h60
  text "Dielectric 2" at 149.41,8856.08 h60
  text "PP-006" at 1079.16,8856.08 h60
  text "7.87mil" at 1938.93,8856.08 h60
  text "4.1" at 2588.76,8856.08 h60
  text "2" at -260.5,8736.08 h60
  text "Power" at 149.41,8736.08 h60
  text "CF-004" at 1079.16,8736.08 h60
  text "1.40mil" at 1938.93,8736.08 h60
  text "Dielectric 1" at 149.41,8616.08 h60
  text "FR-4" at 1079.16,8616.08 h60
  text "40.55mil" at 1938.93,8616.08 h60
  text "4.8" at 2588.76,8616.08 h60
  text "3" at -260.5,8496.08 h60
  text "Ground" at 149.41,8496.08 h60
  text "CF-004" at 1079.16,8496.08 h60
  text "1.40mil" at 1938.93,8496.08 h60
  text "Dielectric 3" at 149.41,8376.08 h60
  text "PP-006" at 1079.16,8376.08 h60
  text "7.87mil" at 1938.93,8376.08 h60
  text "4.1" at 2588.76,8376.08 h60
  text "4" at -260.5,8256.08 h60
  text "Bottom Layer" at 149.41,8256.08 h60
  text "1.40mil" at 1938.93,8256.08 h60
  text "Bottom Solder" at 149.41,8136.08 h60
  text "Solder Resist" at 1079.16,8136.08 h60
  text "0.50mil" at 1938.93,8136.08 h60
  text "3.5" at 2588.76,8136.08 h60
  text "Bottom Overlay" at 149.41,8016.08 h60
Drill Drawing:
  circle w10: c-251.38,1838.83 r33.33
  lines w10: -284.71,1955.5 -218.04,1955.5 -218.04,2022.17 -284.71,2022.17 -284.71,1955.5 ; -284.71,2105.5 -251.38,2122.17 -218.04,2105.5 -234.71,2138.83 -218.04,2172.17 -251.38,2155.5 -284.71,2172.17 -268.04,2138.83 -284.71,2105.5 ; -284.71,2255.5 -284.71,2272.17 -268.04,2288.83 -284.71,2305.5 -284.71,2322.17 -268.04,2322.17 -251.38,2305.5 -234.71,2322.17 -218.04,2322.17 -218.04,2305.5 -234.71,2288.83 -218.04,2272.17 -218.04,2255.5 -234.71,2255.5 -251.38,2272.17 -268.04,2255.5 -284.71,2255.5 ; -284.71,2422.17 -268.04,2422.17 -251.38,2405.5 -234.71,2422.17 -218.04,2422.17 -234.71,2438.83 -218.04,2455.5 -234.71,2455.5 -251.38,2472.17 -268.04,2455.5 -284.71,2455.5 -268.04,2438.83 -284.71,2422.17 ; -284.71,2588.83 -251.38,2555.5 -218.04,2588.83 -251.38,2622.17 -284.71,2588.83 ; -284.71,2772.17 -218.04,2772.17 -251.38,2705.5 -284.71,2772.17 ; -284.71,2872.17 -268.04,2872.17 -268.04,2855.5 -234.71,2855.5 -234.71,2872.17 -218.04,2872.17 -218.04,2905.5 -234.71,2905.5 -234.71,2922.17 -268.04,2922.17 -268.04,2905.5 -284.71,2905.5 -284.71,2872.17
  lines w15: -344.5,1760.5 12629.87,1760.5 ; -344.5,2960.5 12629.87,2960.5 ; 206.38,1610.5 206.38,3110.5 ; 806.22,1610.5 806.22,3110.5 ; 1955.88,1610.5 1955.88,3110.5 ; 2461.76,1610.5 2461.76,3110.5 ; 3195.56,1610.5 3195.56,3110.5 ; 4695.11,1610.5 4695.11,3110.5 ; 5284.96,1610.5 5284.96,3110.5 ; 6030.76,1610.5 6030.76,3110.5 ; 6840.53,1610.5 6840.53,3110.5 ; 7694.29,1610.5 7694.29,3110.5 ; 9027.9,1610.5 9027.9,3110.5 ; 10361.51,1610.5 10361.51,3110.5 ; 11227.27,1610.5 11227.27,3110.5 ; -344.5,1610.5 12629.87,1610.5 12629.87,3110.5 -344.5,3110.5 -344.5,1610.5
  text "Symbol" at -254.5,3005.5 h72
  text "Count" at 251.38,3005.5 h72
  text "Hole Size" at 851.22,3005.5 h72
  text "Plated" at 2000.88,3005.5 h72
  text "Hole Type" at 2506.76,3005.5 h72
  text "Drill Layer Pair" at 3240.56,3005.5 h72
  text "Via/Pad" at 4740.11,3005.5 h72
  text "Pad Shape" at 5329.96,3005.5 h72
  text "Template" at 6075.76,3005.5 h72
  text "Description" at 6885.53,3005.5 h72
  text "Hole Tolerance (+)" at 7739.29,3005.5 h72
  text "Hole Tolerance (-)" at 9072.9,3005.5 h72
  text "Hole Length" at 10406.51,3005.5 h72
  text "Routed Path Length" at 11272.27,3005.5 h72
  text "4" at 251.38,2855.5 h60
  text "35.43mil (0.900mm)" at 851.22,2855.5 h60
  text "PTH" at 2000.88,2855.5 h60
  text "Round" at 2506.76,2855.5 h60
  text "Top Layer - Bottom Layer" at 3240.56,2855.5 h60
  text "Pad" at 4740.11,2855.5 h60
  text "(Mixed)" at 5329.96,2855.5 h60
  text "(Mixed)" at 6075.76,2855.5 h60
  text "-" at 10406.51,2855.5 h60
  text "-" at 11272.27,2855.5 h60
  text "4" at 251.38,2705.5 h60
  text "37.40mil (0.950mm)" at 851.22,2705.5 h60
  text "PTH" at 2000.88,2705.5 h60
  text "Round" at 2506.76,2705.5 h60
  text "Top Layer - Bottom Layer" at 3240.56,2705.5 h60
  text "Pad" at 4740.11,2705.5 h60
  text "(Mixed)" at 5329.96,2705.5 h60
  text "(Mixed)" at 6075.76,2705.5 h60
  text "-" at 10406.51,2705.5 h60
  text "-" at 11272.27,2705.5 h60
  text "4" at 251.38,2555.5 h60
  text "64.17mil (1.630mm)" at 851.22,2555.5 h60
  text "PTH" at 2000.88,2555.5 h60
  text "Round" at 2506.76,2555.5 h60
  text "Top Layer - Bottom Layer" at 3240.56,2555.5 h60
  text "Pad" at 4740.11,2555.5 h60
  text "Rounded" at 5329.96,2555.5 h60
  text "c280h163" at 6075.76,2555.5 h60
  text "-" at 10406.51,2555.5 h60
  text "-" at 11272.27,2555.5 h60
  text "4" at 251.38,2405.5 h60
  text "125.98mil (3.200mm)" at 851.22,2405.5 h60
  text "NPTH" at 2000.88,2405.5 h60
  text "Round" at 2506.76,2405.5 h60
  text "Top Layer - Bottom Layer" at 3240.56,2405.5 h60
  text "Pad" at 4740.11,2405.5 h60
  text "Rounded" at 5329.96,2405.5 h60
  text "c0hn320" at 6075.76,2405.5 h60
  text "-" at 10406.51,2405.5 h60
  text "-" at 11272.27,2405.5 h60
  text "4" at 251.38,2255.5 h60
  text "125.98mil (3.200mm)" at 851.22,2255.5 h60
  text "PTH" at 2000.88,2255.5 h60
  text "Round" at 2506.76,2255.5 h60
  text "Top Layer - Bottom Layer" at 3240.56,2255.5 h60
  text "Pad" at 4740.11,2255.5 h60
  text "Rounded" at 5329.96,2255.5 h60
  text "c320h320m325" at 6075.76,2255.5 h60
  text "-" at 10406.51,2255.5 h60
  text "-" at 11272.27,2255.5 h60
  text "8" at 251.38,2105.5 h60
  text "40.16mil (1.020mm)" at 851.22,2105.5 h60
  text "PTH" at 2000.88,2105.5 h60
  text "Round" at 2506.76,2105.5 h60
  text "Top Layer - Bottom Layer" at 3240.56,2105.5 h60
  text "Pad" at 4740.11,2105.5 h60
  text "Rounded" at 5329.96,2105.5 h60
  text "c200h102" at 6075.76,2105.5 h60
  text "-" at 10406.51,2105.5 h60
  text "-" at 11272.27,2105.5 h60
  text "16" at 251.38,1955.5 h60
  text "35.04mil (0.890mm)" at 851.22,1955.5 h60
  text "PTH" at 2000.88,1955.5 h60
  text "Round" at 2506.76,1955.5 h60
  text "Top Layer - Bottom Layer" at 3240.56,1955.5 h60
  text "Pad" at 4740.11,1955.5 h60
  text "Rounded" at 5329.96,1955.5 h60
  text "c178h89" at 6075.76,1955.5 h60
  text "-" at 10406.51,1955.5 h60
  text "-" at 11272.27,1955.5 h60
  text "192" at 251.38,1805.5 h60
  text "11.81mil (0.300mm)" at 851.22,1805.5 h60
  text "PTH" at 2000.88,1805.5 h60
  text "Round" at 2506.76,1805.5 h60
  text "Top Layer - Bottom Layer" at 3240.56,1805.5 h60
  text "(Mixed)" at 4740.11,1805.5 h60
  text "Rounded" at 5329.96,1805.5 h60
  text "(Mixed)" at 6075.76,1805.5 h60
  text "-" at 10406.51,1805.5 h60
  text "-" at 11272.27,1805.5 h60
  text "236 Total" at 251.38,1655.5 h60

## Dimensions
-203.19,-43.35 to 1425.19,-44.8 on Dimension
-36.19,1448.82 to -41.81,-204.72 on Dimension